# Altium PCB Membrane_Board.PcbDoc (part 3 of 5)
Units mm, origin at the board's own origin, x right, y up, seen from the top; angles counter-clockwise.
Board outline 303 x 126.06 mm, 2 copper layers (Top Layer, Bottom Layer), stack 1.499 mm thick; 248 components, 169 nets, 1258 pads, 728 vias.
Unrouted connection lines stored in the file: 317.
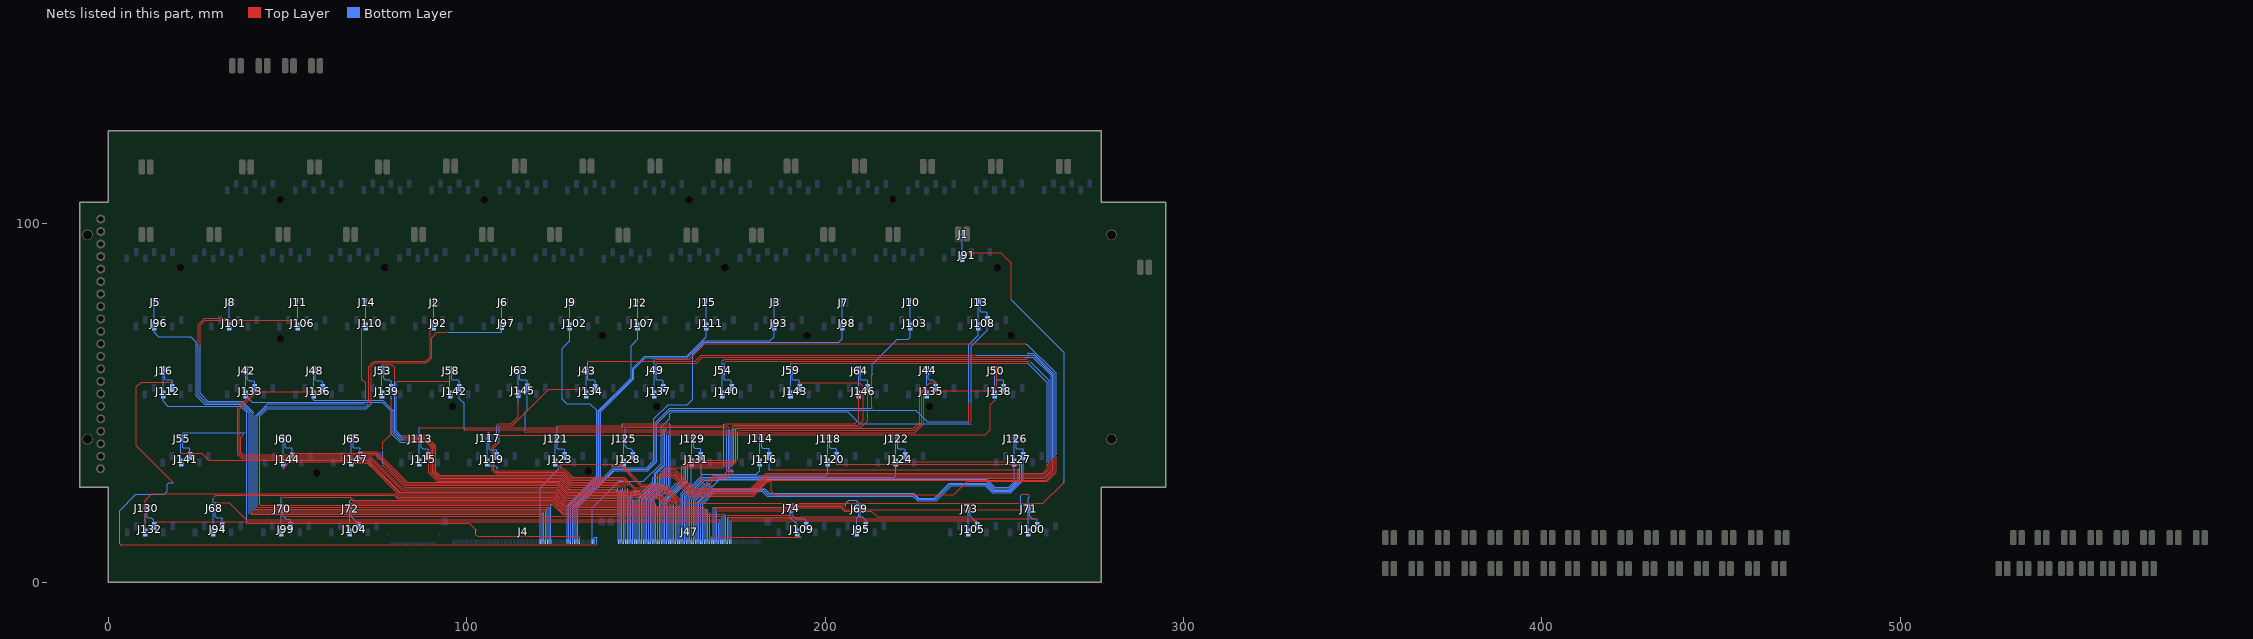
[diagram p3: the nets of this part, all layers, seen from the top]

## Via types
v1: diameter 0.4, hole 0.2, Top Layer to Bottom Layer, tented both sides, 724 vias
v2: diameter 0.4, hole 0.2, Top Layer to Bottom Layer, 3 vias
v3: diameter 0.6, hole 0.3, Top Layer to Bottom Layer, 1 vias

## Nets (pads, with @x,y where several pads share a name; then routed paths per layer and width w, separated by ;. In a path a pad name is that pad's centre, name@x,y a point inside that pad or via, vN(x,y) a via of type N, cw(c..) or ccw(c..) an arc to the next point about the centre after c; other vN are vias at no path point) (continued)
I2C5.SCL_39: J4.79 J13.4 J108.4 | length 171.7
  Top Layer w0.203: v1(240.761,49.821) 240.761,44.309 v1@240.787,44.284
  Bottom Layer w0.203: J4.79@134.981,11.374 134.981,20.749 142.362,28.129 149.27,28.129 154.249,33.108 154.249,43.344 156.591,45.686 156.591,46.965 157.238,47.611 206.293,47.611 209.621,44.284 v1(240.761,44.284)
  Bottom Layer w0.254: v1(240.761,49.821) 240.761,65.823 245.241,70.303 245.241,75.101 244.835,75.508 243.391,75.508 243.242,75.657 J13.4@243.242,78.073
I2C5.SCL_40: J4.80 J16.4 J112.4 | length 214.1
  Top Layer w0.203: v1(3.119,10.476) v1(136.291,10.476) ; v1(17.749,55.841) 9.088,55.841 7.818,54.571 7.818,38.061 v1(18.13,27.748)
  Bottom Layer w0.203: v1(3.119,10.476) 3.119,20.027 7.665,24.573 15.616,24.573 16.403,25.361 16.403,27.367 16.784,27.748 v1(18.13,27.748) ; J4.80@135.481,11.315 135.481,12.359 135.707,12.585 136.172,12.585 136.291,12.466 v1(136.291,10.476)
  Bottom Layer w0.254: J16.4@15.751,59.074 15.751,56.849 16.091,56.509 17.539,56.509 17.749,56.298 J112.4@17.749,54.251
I2C5.SDA_26: J1.3 J4.50 J91.3 | length 260.1
  Top Layer w0.203: v1(125.699,31.66) 125.699,32.27 126.385,32.955 143.098,32.955 148.813,27.24 155.265,27.24 160.497,22.008 260.751,22.008 v1(266.72,27.977) ; v1(238.272,91.96) 248.94,91.96 251.861,89.039 v1(251.861,78.904)
  Bottom Layer w0.203: J4.50@120.481,11.285 J4.50@120.481,11.315 120.481,26.442 v1(125.699,31.66) ; v1(251.861,78.904) 266.72,64.045 v1(266.72,27.977)
  Bottom Layer w0.254: J91.3@238.28,90.408 J1.3@238.28,97.072
I2C5.SDA_27: J4.51 J5.3 J96.3 | length 170.7
  Top Layer w0.203: v1(39.288,18.96) v1(120.975,18.96)
  Bottom Layer w0.203: J96.3@12.744,71.409 12.744,69.711 13.888,68.566 22.931,68.566 24.48,67.017 24.48,52.005 26.817,49.669 36.926,49.669 39.288,47.306 v1(39.288,18.96) ; J4.51@120.986,11.26 v1@120.986,18.96
  Bottom Layer w0.254: J96.3@12.744,71.409 J5.3@12.744,78.073
I2C5.SDA_28: J4.52 J8.3 J101.3 | length 170.2
  Top Layer w0.203: v1(39.822,19.443) v1(121.481,19.443)
  Top Layer w0.254: v1(25.064,66.356) 25.064,71.868 26.842,73.646 v1(33.726,73.646)
  Bottom Layer w0.203: v1(25.064,66.356) 25.064,52.31 27.274,50.1 37.129,50.1 39.822,47.408 v1(39.822,19.443) ; J4.52@121.481,11.315 v1(121.481,19.443)
  Bottom Layer w0.254: J101.3@33.726,71.409 v1(33.726,73.646) J8.3@33.726,78.073
I2C5.SDA_29: J4.53 J11.3 J106.3 | length 188.2
  Top Layer w0.203: v1(40.404,19.927) v1(121.981,19.927)
  Top Layer w0.254: v1(25.572,65.95) 25.572,71.69 27.02,73.138 v1(52.725,73.138)
  Bottom Layer w0.203: v1(25.572,65.95) 25.572,52.691 27.757,50.507 37.358,50.507 40.406,47.459 40.406,19.928 v1(40.404,19.927) ; J4.53@121.981,11.315 v1(121.981,19.927)
  Bottom Layer w0.254: J106.3@52.766,71.409 52.725,71.45 v1(52.725,73.138) 52.746,73.159 52.746,78.053 J11.3@52.766,78.073
I2C5.SDA_30: J4.54 J14.3 J110.3 | length 179.6
  Top Layer w0.203: v1(40.99,20.433) 122.448,20.433 v1(122.473,20.459) ; v1(71.775,49.821) 71.775,55.625 70.708,56.692 70.708,71.97 v1(71.775,73.037)
  Bottom Layer w0.203: v1(40.99,20.433) 40.99,46.367 44.445,49.821 v1(71.775,49.821) ; J4.54@122.481,11.315 v1@122.481,20.459
  Bottom Layer w0.254: J110.3@71.758,71.409 J14.3@71.758,78.073
I2C5.SDA_31: J2.3 J4.55 J92.3 | length 195
  Top Layer w0.203: v1(41.574,20.967) v1(122.981,20.967) ; v1(72.588,49.821) 72.588,60.21 74.01,61.632 88.514,61.632 89.733,62.851 89.733,72.249 v1(90.723,73.24)
  Bottom Layer w0.203: v1(41.574,20.967) 41.574,46.348 44.184,48.957 71.724,48.957 v1(72.588,49.821) ; J4.55@122.981,11.315 v1(122.981,20.967)
  Bottom Layer w0.254: J92.3@90.706,71.384 J2.3@90.706,78.048
I2C5.SDA_32: J4.56 J6.3 J97.3 | length 211.3
  Top Layer w0.203: v1(42.159,21.475) 42.171,21.462 v1@123.464,21.462 ; v1(73.299,49.821) 73.299,60.21 74.29,61.2 88.768,61.2 90.19,62.623 90.19,68.287 91.638,69.735 v1(94.559,69.735)
  Bottom Layer w0.203: v1(42.159,21.475) 42.159,46.341 44.292,48.475 71.953,48.475 v1(73.299,49.821) ; J4.56@123.481,11.315 v1@123.481,21.466
  Bottom Layer w0.254: v1(94.559,69.735) 109.548,69.735 109.756,69.942 J97.3@109.756,71.434 J6.3@109.756,78.099
  other v1: 123.489,21.466
I2C5.SDA_33: J4.65 J9.3 J102.3 | length 78.8
  Bottom Layer w0.203: J4.65@127.981,11.315 127.981,21.42 136.246,29.684 136.246,47.936 134.335,49.846 127.858,49.846 126.664,51.04 126.664,65.239 128.773,67.347 J102.3@128.773,71.409
  Bottom Layer w0.254: J102.3@128.773,71.409 J9.3@128.773,78.073
I2C5.SDA_34: J4.66 J12.3 J107.3 | length 74.6
  Bottom Layer w0.203: J4.66@128.481,11.315 128.481,21.381 136.627,29.526 136.627,47.844 145.872,57.09 145.872,66.057 146.984,67.169 147.302,67.487
  Bottom Layer w0.254: 147.302,67.487 147.619,67.804 J107.3@147.619,71.333 J12.3@147.619,77.997
I2C5.SDA_35: J4.67 J15.3 J111.3 | length 89.3
  Bottom Layer w0.203: J4.67@128.981,11.315 128.981,21.226 137.008,29.252 137.008,47.687 146.253,56.932 146.253,59.682 149.702,63.131 161.412,63.131 166.771,68.49 J111.3@166.771,70.928
  Bottom Layer w0.254: J111.3@166.779,70.928 J111.3@166.779,71.409 J15.3@166.779,78.073
I2C5.SDA_36: J3.3 J4.68 J93.3 | length 107.7
  Bottom Layer w0.203: J4.68@129.481,11.315 129.481,21.142 137.389,29.049 137.389,47.529 146.634,56.774 146.634,59.504 149.829,62.699 161.539,62.699 166.187,67.347 184.576,67.347 185.78,68.55 J93.3@185.78,71.409
  Bottom Layer w0.254: J93.3@185.78,71.409 J3.3@185.78,78.073
I2C5.SDA_37: J4.69 J7.3 J98.3 | length 128.2
  Bottom Layer w0.203: J4.69@129.981,11.315 129.981,21.083 140.896,31.998 150.192,31.998 152.217,34.022 152.217,45.588 156.196,49.567 161.539,49.567 163.063,51.091 163.063,63.684 166.345,66.966 203.728,66.966 204.779,68.017 J98.3@204.779,71.384
  Bottom Layer w0.254: J98.3@204.779,71.384 J7.3@204.779,78.048
I2C5.SDA_38: J4.70 J10.3 J103.3 | length 145.6
  Top Layer w0.203: v1(213.05,48.526) 213.05,58.051 v1(213.075,58.076)
  Bottom Layer w0.203: J4.70@130.481,11.374 130.481,21.024 141.066,31.609 150.388,31.609 152.598,33.819 152.598,44.487 156.636,48.526 v1(213.05,48.526) ; v1(213.075,58.076) 213.075,60.794 220.086,67.804 223.159,67.804 223.769,68.414 J103.3@223.769,71.409
  Bottom Layer w0.254: J103.3@223.761,71.409 J10.3@223.761,78.073
I2C5.SDA_39: J4.71 J13.3 J108.3 | length 171.8
  Top Layer w0.203: v1(240.101,44.843) v1(240.101,49.821)
  Bottom Layer w0.203: J4.71@130.981,11.374 130.981,20.965 141.193,31.177 150.515,31.177 152.979,33.641 152.979,44.258 156.713,47.992 225.318,47.992 228.468,44.843 v1(240.101,44.843) ; v1(240.101,49.821) 240.101,66.229 242.742,68.871 J108.3@242.742,71.409
  Bottom Layer w0.254: J108.3@242.742,71.409 J13.3@242.742,78.073
I2C5.SDA_40: J4.72 J16.3 J112.3 | length 160.8
  Top Layer w0.203: v1(38.623,16.398) 38.677,16.398 38.775,16.496 100.629,16.496 v1(102.534,14.591) ; v1@102.547,13.283 103.042,12.788 v1(131.481,12.788)
  Bottom Layer w0.203: J112.3@15.251,52.41 15.251,50.516 16.581,49.186 36.825,49.186 38.623,47.387 v1(38.623,16.398) ; v1(102.534,13.27) v1(102.534,14.591) ; J4.72@131.481,11.374 v1(131.481,12.788)
  Bottom Layer w0.254: J112.3@15.251,52.41 J16.3@15.251,59.074
I2C_2.SCL_66: J47.58 J68.4 J94.4 | length 157.3
  Top Layer w0.203: v1(29.746,22.138) 31.685,22.138 31.761,22.214 33.646,22.214 38.476,17.385 v1(170.759,17.385)
  Bottom Layer w0.203: J68.4@29.729,20.593 29.737,20.602 29.737,22.13 v1(29.746,22.138) ; J47.58@170.759,11.316 v1@170.759,17.461
  Bottom Layer w0.254: J68.4@29.729,20.593 29.729,18.385 30.112,18.002 31.62,18.002 31.769,17.853 J94.4@31.769,15.729
I2C_2.SCL_67: J47.59 J70.4 J99.4 | length 135.8
  Top Layer w0.203: v1(48.763,18.477) v1(171.267,18.477)
  Bottom Layer w0.203: J47.59@171.267,11.321 v1@171.267,18.325
  Bottom Layer w0.254: J70.4@48.755,20.568 48.759,20.564 v1@48.759,18.456 ; v1@48.763,18.452 49.601,17.614 50.646,17.614 50.795,17.465 J99.4@50.795,15.703
I2C_2.SCL_68: J47.60 J72.4 J104.4 | length 120.4
  Top Layer w0.203: v1(67.762,22.237) 68.041,21.957 123.743,21.957 126.715,18.985 v1(171.749,18.985)
  Bottom Layer w0.203: J72.4@67.77,20.568 v1@67.77,22.229 ; J47.60@171.76,11.315 v1@171.76,18.985
  Bottom Layer w0.254: J72.4@67.787,20.568 67.787,18.35 69.302,16.836 69.302,16.211 J104.4@69.81,15.703
I2C_2.SCL_69: J47.61 J74.4 J109.4 | length 33.9
  Top Layer w0.203: v1(172.257,18.681) 172.263,18.687 v1@190.817,18.687
  Bottom Layer w0.203: v1(172.257,18.681) 172.26,18.678 J47.61@172.26,11.315
  Bottom Layer w0.254: J74.4@190.758,20.593 v1(190.758,18.693) 191.786,17.665 194.305,17.665 194.678,17.292 J109.4@194.678,15.729
I2C_2.SCL_70: J47.62 J69.4 J95.4 | length 49.7
  Top Layer w0.203: v1(172.765,18.198) 193.268,18.198 193.294,18.223 v1(209.799,18.223)
  Bottom Layer w0.203: J47.62@172.76,11.315 172.76,18.193 v1(172.765,18.198)
  Bottom Layer w0.254: J69.4@209.807,20.568 209.803,20.564 209.803,18.227 v1(209.799,18.223) 210.332,18.223 211.313,17.242 J95.4@211.313,15.729
I2C_2.SCL_71: J47.63 J71.4 J100.4 | length 98.8
  Top Layer w0.203: v1@173.248,17.725 v1(259.135,17.725)
  Bottom Layer w0.203: v1(173.248,17.715) 173.26,17.703 J47.63@173.26,11.315
  Bottom Layer w0.254: J71.4@257.085,20.577 257.085,18.384 257.744,17.725 v1(259.135,17.725) 259.135,16.764 259.106,16.764 J100.4@259.125,15.791
I2C_2.SCL_72: J47.64 J73.4 J105.4 | length 80.9
  Top Layer w0.203: v1(173.756,17.207) v1(242.565,17.207)
  Bottom Layer w0.203: v1(173.756,17.207) 173.76,17.203 J47.64@173.76,11.315
  Bottom Layer w0.254: J73.4@240.423,20.568 240.423,18.485 241.701,17.207 v1(242.565,17.207) 242.565,15.883 J105.4@242.463,15.782
I2C_2.SDA_66: J47.50 J68.3 J94.3 | length 158.1
  Top Layer w0.203: v1(29.255,23.507) 29.991,24.242 79.701,24.242 80.665,23.278 124.246,23.278 127.1,20.424 v1(166.746,20.424)
  Bottom Layer w0.203: J68.3@29.255,20.62 v1(29.255,23.507) ; v1(166.746,20.424) 166.753,20.416 166.753,11.322 J47.50@166.76,11.315
  Bottom Layer w0.254: J94.3@29.229,13.929 J68.3@29.229,20.593 J68.3@29.255,20.62
I2C_2.SDA_67: J47.51 J70.3 J99.3 | length 139
  Top Layer w0.203: v1(48.255,23.71) 67.559,23.71 68.422,22.846 123.997,22.846 126.899,19.944 v1(167.254,19.944)
  Bottom Layer w0.203: v1(167.254,19.944) 167.26,19.938 J47.51@167.26,11.315
  Bottom Layer w0.254: J99.3@48.255,13.903 J70.3@48.255,20.568 v1(48.255,23.71)
I2C_2.SDA_68: J47.52 J72.3 J104.3 | length 119
  Top Layer w0.203: v1(67.279,23.024) 67.686,23.024 68.295,22.414 123.87,22.414 126.82,19.465 v1(167.762,19.465)
  Bottom Layer w0.203: J72.3@67.266,20.723 v1@67.266,23.011 ; J47.52@167.761,11.315 v1(167.762,19.465)
  Bottom Layer w0.254: J104.3@67.27,13.982 J72.3@67.27,20.568 J72.3@67.287,20.585
I2C_2.SDA_69: J47.53 J74.3 J109.3 | length 35.4
  Top Layer w0.203: v1(168.27,12.585) v1(193.111,12.585)
  Bottom Layer w0.203: J47.53@168.26,11.315 v1@168.26,12.585 ; J74.3@190.258,20.593 190.258,18.028 192.138,16.149 192.138,13.464 192.671,12.93 192.765,12.93 v1(193.111,12.585)
I2C_2.SDA_70: J47.54 J69.3 J95.3 | length 60.6
  Top Layer w0.203: v1(168.76,20.957) 190.764,20.957 191.409,21.602 205.303,21.602 v2(205.785,21.119)
  Bottom Layer w0.203: J47.54@168.76,11.315 v1(168.76,20.957) ; v2(205.785,21.119) 205.785,22.008 206.63,22.853 208.573,22.853 209.307,22.119 J69.3@209.307,20.568 209.307,18.519 208.773,17.985 J95.3@208.773,13.929
I2C_2.SDA_71: J47.55 J71.3 J100.3 | length 112.3
  Top Layer w0.203: v1(169.26,20.459) 190.977,20.459 191.739,21.221 204.515,21.221 205.481,20.255 v1(254.503,20.255) ; v1(254.503,24.573) v1(256.992,24.573)
  Bottom Layer w0.203: J47.55@169.26,11.315 v1(169.26,20.459) ; v1(254.503,20.255) v1(254.503,24.573) ; J71.3@256.595,20.568 256.595,23.516 256.992,23.913 v1(256.992,24.573)
  Bottom Layer w0.254: J100.3@256.595,14 J71.3@256.595,20.255
I2C_2.SDA_72: J47.56 J73.3 J105.3 | length 86.9
  Top Layer w0.203: v1(169.76,19.951) 189.047,19.951 191.18,19.951 192.069,20.84 204.338,20.84 205.303,19.874 212.847,19.874 214.472,18.249 v1(239.923,18.249)
  Bottom Layer w0.203: J47.56@169.76,11.315 v1@169.76,19.96
  Bottom Layer w0.254: J105.3@239.923,13.982 v1(239.923,18.249) J73.3@239.923,20.568 J73.3@239.936,20.58
I2C_3.SCL_56: J47.32 J113.4 J115.4 | length 95.5
  Top Layer w0.203: v1(89.301,36.635) 89.301,30.619 91.689,28.231 125.826,28.231 128.569,25.488 147.619,25.488 148.432,24.675 154.046,24.675 155.849,22.872 157.17,22.872 157.729,22.313 v1(157.729,21.906)
  Bottom Layer w0.203: v1@157.732,21.906 157.732,11.343 J47.32@157.76,11.315
  Bottom Layer w0.254: J113.4@87.244,40.1 87.244,37.741 87.66,37.324 89.123,37.324 89.301,37.146 v1(89.301,36.635) ; J115.4@89.284,35.236 v1@89.284,36.635
I2C_3.SCL_57: J47.41 J117.4 J119.4 | length 114.3
  Top Layer w0.203: v1(105.913,41.922) 106.751,41.083 154.452,41.083 155.62,42.252 v1(173.553,42.252) ; v1@166.619,27.799 168.741,29.921 171.509,29.921 v1(173.527,31.939)
  Bottom Layer w0.203: v1(105.913,41.922) 106.224,41.61 106.224,40.144 J117.4@106.243,40.126 106.243,37.324 ; J119.4@108.241,35.303 J119.4@108.283,35.261 ; J47.41@162.26,11.315 162.26,23.441 v1@166.619,27.799 ; v1(173.527,31.939) 173.527,42.226 v1(173.553,42.252)
  Bottom Layer w0.254: 106.243,37.324 106.573,36.994 108.151,36.994 108.3,36.845 108.3,36.234 J119.4@108.241,35.303
  other v1: 166.619,27.774
I2C_3.SCL_58: J47.42 J121.4 J123.4 | length 97.3
  Top Layer w0.203: v1(125.242,43.7) 172.486,43.7 173.045,43.141 v1(173.045,42.734) ; v1(167.355,27.774) 169.096,29.515 172.066,29.515 v1(173.99,31.439)
  Bottom Layer w0.203: J47.42@162.76,11.315 162.76,23.153 v1@167.381,27.774 ; v1(173.045,42.734) 173.045,31.66 173.266,31.439 v1(173.99,31.439)
  Bottom Layer w0.254: J121.4@125.225,40.1 125.225,37.346 125.373,37.197 127.097,37.197 127.265,37.029 J123.4@127.265,35.236 ; J121.4@125.242,40.118 v1@125.242,43.649
I2C_3.SCL_59: J47.43 J125.4 J128.4 | length 77.5
  Top Layer w0.203: v1(144.241,43.09) 145.054,43.09 145.232,43.268 171.953,43.268 v1(172.461,42.76) ; v1(168.046,27.774) 169.279,29.007 172.571,29.007 v1(174.523,30.959)
  Bottom Layer w0.203: J47.43@163.26,11.315 163.26,22.988 v1(168.046,27.774) ; v1(172.461,42.76) 172.461,31.451 172.952,30.959 v1(174.523,30.959)
  Bottom Layer w0.254: v1@144.229,43.09 144.229,40.113 J125.4@144.216,40.1 144.216,37.959 144.775,37.4 145.537,37.4 146.256,36.681 J128.4@146.256,35.236
I2C_3.SCL_60: J47.44 J129.4 J131.4 | length 34.7
  Top Layer w0.203: v1(165.349,30.263) 165.349,28.155 166.288,27.215 v1(168.27,27.215)
  Bottom Layer w0.203: J47.44@163.76,11.315 163.76,22.705 v1(168.27,27.215) ; J131.4@165.288,35.236 165.349,35.176 v1(165.349,30.263)
  Bottom Layer w0.254: J129.4@163.248,40.1 163.248,37.723 163.621,37.35 165.018,37.35 165.286,37.082 165.286,35.238 J131.4@165.288,35.236
I2C_3.SCL_61: J47.45 J114.4 J116.4 | length 188.1
  Top Layer w0.203: v1(184.322,31.381) v1(253.817,31.381) v1@253.764,31.381
  Bottom Layer w0.203: J47.45@164.26,11.315 164.26,22.393 170.442,28.575 244.684,28.575 247.137,26.123 251.322,26.123 253.817,28.617 v1(253.817,31.381) ; v1(184.322,31.381) J116.4@184.322,35.253
  Bottom Layer w0.254: J114.4@182.29,40.126 182.29,37.68 182.519,37.451 184.182,37.451 184.33,37.302 J116.4@184.33,35.261
I2C_3.SCL_62: J47.46 J118.4 J120.4 | length 171.1
  Top Layer w0.203: v1(203.245,32.955) v1(254.325,32.955)
  Bottom Layer w0.203: J47.46@164.76,11.315 164.76,22.181 168.727,26.148 183.078,26.148 184.399,24.827 224.765,24.827 226.111,23.481 230.373,23.481 234.564,27.672 245.048,27.672 246.979,25.742 251.48,25.742 254.35,28.612 v1@254.35,32.981
  Bottom Layer w0.254: J118.4@201.193,40.105 J118.4@201.197,40.1 201.197,37.741 201.589,37.35 202.759,37.35 203.237,36.871 J120.4@203.237,35.236 v1@203.237,32.955
I2C_3.SCL_63: J47.47 J122.4 J124.4 | length 152.6
  Top Layer w0.203: v1(222.295,33.565) v1(254.833,33.565)
  Bottom Layer w0.203: J47.47@165.26,11.315 165.26,21.945 169.082,25.767 182.748,25.767 184.119,24.396 224.658,24.396 225.953,23.1 230.703,23.1 234.894,27.291 244.856,27.291 246.796,25.351 251.642,25.351 254.833,28.541 v1@254.833,33.463 ; J124.4@222.27,35.211 222.295,35.185 v1(222.295,33.565)
  Bottom Layer w0.254: J122.4@220.213,40.067 220.213,37.417 220.361,37.268 222.121,37.268 222.27,37.119 J124.4@222.27,35.211 ; J122.4@220.23,40.075 J122.4@220.234,40.079
I2C_3.SCL_64: J47.48 J126.4 J127.4 | length 120.1
  Bottom Layer w0.203: J47.48@165.76,11.315 165.76,21.759 169.362,25.361 182.468,25.361 183.814,24.015 224.48,24.015 225.775,22.719 230.982,22.719 235.173,26.91 244.698,26.91 246.639,24.97 251.8,24.97 255.314,28.484 J127.4@255.314,35.211
  Bottom Layer w0.254: J126.4@253.291,40.092 J126.4@253.274,40.075 253.274,37.399 253.423,37.251 255.165,37.251 255.314,37.102 J127.4@255.314,35.211
I2C_3.SCL_65: J47.57 J130.4 J132.4 | length 169.5
  Top Layer w0.203: v1(12.796,17.182) 13.101,16.877 v1(170.251,16.877)
  Bottom Layer w0.203: J47.57@170.251,11.324 v1(170.251,16.877)
  Bottom Layer w0.254: J130.4@10.756,20.593 10.756,18.176 10.905,18.028 11.951,18.028 v1(12.796,17.182) J132.4@12.796,15.729
I2C_3.SDA_56: J47.24 J113.3 J115.3 | length 115.5
  Top Layer w0.203: 87.015,43.09 v1(143.327,43.09) ; v1(143.327,44.258) 156.789,44.258 v1(156.814,44.284)
  Bottom Layer w0.203: J115.3@86.304,32.996 J115.3@86.744,33.436 ; v1(143.327,43.09) v1(143.327,44.258) ; J47.24@153.764,11.318 153.764,23.682 156.814,26.732 v1(156.814,44.284)
  Bottom Layer w0.254: J113.3@86.731,40.113 86.752,40.134 v1@86.752,43.09 ; J115.3@86.744,33.436 J113.3@86.744,40.1
  other v1: 86.761,43.09
I2C_3.SDA_57: J47.33 J117.3 J119.3 | length 76.7
  Top Layer w0.203: v1(108.478,31.177) 127.045,31.177 129.382,28.841 143.835,28.841 146.807,25.869 154.782,25.869 157.386,23.265 158.262,22.389 v1(158.262,21.398)
  Bottom Layer w0.203: J47.33@158.26,11.315 158.261,11.316 v1(158.262,21.398)
  Bottom Layer w0.254: J119.3@105.743,33.461 105.743,33.717 J119.3@106.251,34.225 ; J117.3@105.743,40.126 105.739,40.122 105.739,34.225 J119.3@106.251,34.225 ; v1@108.478,31.254 108.478,31.9 107.89,32.488 106.251,32.488 J119.3@106.251,34.225
I2C_3.SDA_58: J47.34 J121.3 J123.3 | length 54.8
  Top Layer w0.203: v1@126.334,31.635 127.198,31.635 129.585,29.247 143.967,29.247 146.888,26.326 154.935,26.326 157.576,23.684 158.745,22.516 v1(158.745,21.906)
  Bottom Layer w0.203: J123.3@124.725,33.436 J123.3@124.725,33.641 ; 126.283,32.397 126.334,32.346 v1(126.334,31.66) ; v1(158.745,21.906) 158.752,21.899 158.752,11.322 J47.34@158.76,11.315
  Bottom Layer w0.254: J123.3@124.725,33.641 J121.3@124.725,40.1
I2C_3.SDA_59: J47.35 J125.3 J128.3 | length 44.7
  Top Layer w0.203: v1(140.355,32.473) 142.895,32.473 148.559,26.809 155.04,26.809 159.253,22.596 v1(159.253,21.398)
  Bottom Layer w0.203: v1(140.355,32.473) 143.182,32.473 143.716,33.006 J128.3@143.716,33.436 ; v1@159.256,21.398 159.256,11.318 J47.35@159.26,11.315
  Bottom Layer w0.254: J128.3@143.716,33.436 J125.3@143.716,39.839
I2C_3.SDA_60: J47.36 J129.3 J131.3 | length 30
  Bottom Layer w0.203: J47.36@159.76,11.315 159.76,24.776 162.668,27.684 162.668,33.355 J131.3@162.748,33.436
  Bottom Layer w0.254: J131.3@162.748,33.436 J129.3@162.748,40.1
I2C_3.SDA_61: J47.37 J114.3 J116.3 | length 46.4
  Bottom Layer w0.203: J47.37@160.26,11.315 160.26,24.412 165.947,30.099 180.772,30.099 181.79,31.118 J116.3@181.79,33.461
  Bottom Layer w0.254: J116.3@181.79,33.461 J114.3@181.79,40.126
I2C_3.SDA_62: J47.38 J118.3 J120.3 | length 65.1
  Bottom Layer w0.203: J47.38@160.76,11.315 160.76,24.227 165.831,29.298 169.549,29.298 169.969,29.718 200.059,29.718 200.697,30.357 J120.3@200.697,33.436
  Bottom Layer w0.254: J120.3@200.697,33.436 J118.3@200.697,40.1
I2C_3.SDA_63: J47.39 J122.3 J124.3 | length 83.8
  Bottom Layer w0.203: J47.39@161.26,11.315 161.26,24.041 166.136,28.917 169.707,28.917 170.127,29.337 219.236,29.337 219.73,29.831 J124.3@219.73,33.411
  Bottom Layer w0.254: J124.3@219.73,33.411 J122.3@219.73,40.075
I2C_3.SDA_64: J47.40 J126.3 J127.3 | length 119.7
  Bottom Layer w0.203: J47.40@161.76,10.958 161.76,23.88 166.415,28.536 169.864,28.536 170.158,28.829 170.285,28.956 244.842,28.956 244.969,28.829 247.294,26.504 251.164,26.504 252.725,28.064 252.725,33.361 J127.3@252.774,33.411
  Bottom Layer w0.254: J127.3@252.774,33.411 J126.3@252.774,40.075
I2C_3.SDA_65: J47.49 J130.3 J132.3 | length 180.8
  Top Layer w0.203: v1(10.231,16.699) 10.231,22.872 12.009,24.65 79.999,24.65 80.888,23.761 124.302,23.761 127.16,20.903 v1(166.263,20.903)
  Bottom Layer w0.203: J47.49@166.263,11.318 v1(166.263,20.903)
  Bottom Layer w0.254: J132.3@10.256,13.929 10.231,13.954 v1(10.231,16.699) 10.256,16.725 J130.3@10.256,20.593
I2C_4.SCL_41: J42.4 J47.9 J133.4 | length 153.6
  Top Layer w0.203: v1(40.838,52.615) 36.45,48.227 36.45,35.946 37.426,34.971 73.24,34.971 82.087,26.123 124.937,26.123 127.634,23.427 v1(146.271,23.427)
  Bottom Layer w0.203: J47.9@146.26,11.341 146.265,11.346 146.265,23.421 v1(146.271,23.427)
  Bottom Layer w0.254: J42.4@38.78,59.074 38.78,56.715 39.29,56.205 40.423,56.205 40.82,55.807 40.82,53.902 40.838,53.885 v1(40.838,52.615)
I2C_4.SCL_42: J47.10 J48.4 J136.4 | length 174.6
  Top Layer w0.203: v1(59.837,52.64) 59.253,53.225 40.584,53.225 36.069,48.71 36.069,35.692 37.282,34.479 73.045,34.479 81.935,25.589 124.886,25.589 127.553,22.922 v1(146.756,22.922)
  Bottom Layer w0.203: J47.10@146.756,11.319 v1(146.756,22.922)
  Bottom Layer w0.254: J48.4@57.762,59.074 57.762,56.544 58.056,56.25 59.428,56.25 59.802,55.876 J136.4@59.802,54.21 59.802,54.037 59.837,54.002 v1(59.837,52.64)
I2C_4.SCL_43: J47.11 J53.4 J139.4 | length 115.6
  Top Layer w0.203: v1(76.499,32.701) 82.621,26.58 125.09,26.58 127.757,23.913 146.832,23.913 147.26,23.485 v1(147.26,23.432)
  Top Layer w0.254: v1(76.525,36.74) 76.525,39.026 78.862,41.363 v1(78.862,51.176)
  Bottom Layer w0.203: v1(76.499,32.701) 76.512,32.714 76.512,36.727 v1(76.525,36.74) ; J47.11@147.26,11.315 v1(147.26,23.432)
  Bottom Layer w0.254: J53.4@76.822,59.049 76.822,56.865 77.203,56.483 78.414,56.483 78.862,56.035 J139.4@78.862,54.184 v1(78.862,51.176)
I2C_4.SCL_44: J47.12 J58.4 J142.4 | length 108.8
  Top Layer w0.203: v1(99.215,42.531) 154.528,42.531 v1(154.757,42.76)
  Bottom Layer w0.203: J142.4@97.861,54.21 97.912,54.159 97.912,51.193 99.215,49.889 v1(99.215,42.531) ; J47.12@147.76,11.315 147.766,11.321 147.766,23.374 152.369,27.977 152.369,30.441 154.757,32.828 v1(154.757,42.76)
  Bottom Layer w0.254: J58.4@95.821,59.074 95.821,56.657 95.97,56.509 97.413,56.509 97.861,56.061 J142.4@97.861,54.21
I2C_4.SCL_45: J47.13 J63.4 J145.4 | length 92.9
  Top Layer w0.203: v1(116.327,42.049) 154.808,42.049 155.524,42.765 v1(155.524,42.774)
  Bottom Layer w0.203: J47.13@148.26,11.315 148.266,11.321 148.266,23.264 152.75,27.748 152.75,30.187 155.189,32.625 155.189,42.438 v1(155.524,42.774)
  Bottom Layer w0.254: J63.4@114.803,59.099 114.803,56.683 114.951,56.534 116.395,56.534 116.835,56.094 J145.4@116.835,54.364 116.835,47.916 116.327,47.408 v1(116.327,42.049)
I2C_4.SCL_46: J43.4 J47.14 J134.4 | length 303.9
  Top Layer w0.203: v1@133.793,61.683 v1(133.776,61.683) 163.774,61.683 165.45,63.359 v1(241.828,63.359) ; v1(153.293,29.857) 157.703,29.857 162.731,24.829 179.619,24.829 183.785,28.994 261.413,28.994 263.493,31.075 263.493,34.453 v1(263.494,34.454)
  Bottom Layer w0.203: J47.14@148.76,11.315 148.766,11.321 148.766,23.205 153.293,27.732 v1@153.293,29.78 ; v1(241.828,63.359) 258.054,63.359 263.494,57.92 v1(263.494,34.454)
  Bottom Layer w0.254: v1@133.802,61.683 133.784,61.665 J43.4@133.784,59.074 133.784,56.657 133.933,56.509 135.377,56.509 135.824,56.061 J134.4@135.824,54.21
I2C_4.SCL_47: J47.15 J49.4 J137.4 | length 282.7
  Top Layer w0.203: v1(152.801,61.124) 164.104,61.124 165.755,62.775 v1(255.274,62.775) ; v1(153.792,30.339) 157.805,30.339 162.833,25.311 179.549,25.311 183.714,29.477 261.21,29.477 263.012,31.279 v1(263.012,33.997)
  Bottom Layer w0.203: J47.15@149.26,11.315 149.26,23.115 153.792,27.647 v1@153.792,30.263 ; v1(152.801,61.124) 152.81,61.115 152.81,59.108 J49.4@152.818,59.099 ; v1(255.274,62.775) 257.957,62.775 263.012,57.72 v1(263.012,33.997)
  Bottom Layer w0.254: J49.4@152.818,59.099 152.818,56.683 152.967,56.534 154.411,56.534 154.817,56.128 154.817,54.235 154.858,54.194 J137.4@154.833,54.168
I2C_4.SCL_48: J47.16 J54.4 J140.4 | length 260.4
  Top Layer w0.203: v1(154.291,30.822) 157.983,30.822 163.011,25.794 179.492,25.794 183.658,29.96 260.981,29.96 262.528,31.506 262.528,33.538 v1(262.529,33.54) ; v1(171.818,61.175) 172.3,61.657 v1@257.068,61.657
  Bottom Layer w0.203: J47.16@149.76,11.315 149.76,23.006 154.291,27.537 v1(154.291,30.822) ; J54.4@171.816,59.099 v1@171.816,61.072 ; v1(257.068,61.632) 262.528,56.172 v1(262.529,33.54)
  Bottom Layer w0.254: J54.4@171.816,59.099 171.816,56.683 171.965,56.534 173.408,56.534 173.815,56.128 J140.4@173.815,54.277
I2C_4.SCL_49: J47.25 J59.4 J143.4 | length 119.7
  Top Layer w0.203: 160.167,32.447 v1(174.035,32.447) ; v1(174.035,42.76) 174.035,43.446 174.416,43.827 209.189,43.827 210.586,45.224 210.586,54.52 209.489,55.618 v1(192.814,55.618)
  Bottom Layer w0.203: J47.25@154.26,11.315 154.26,22.654 159.964,28.358 v1(159.964,32.447) ; v1(174.035,32.447) v1(174.035,42.76)
  Bottom Layer w0.254: J59.4@190.815,59.099 190.815,56.683 190.964,56.534 192.408,56.534 192.814,56.128 v1(192.814,55.618) J143.4@192.814,54.277
I2C_4.SCL_50: J47.26 J64.4 J146.4 | length 101.9
  Top Layer w0.203: v1(160.599,33.006) v1(174.543,33.006) ; v1(174.543,42.404) 174.543,43.039 174.899,43.395 210.205,43.395 211.856,45.046 v1(211.856,52.59)
  Bottom Layer w0.203: J47.26@154.76,11.315 154.76,22.494 160.599,28.333 v1(160.599,33.006) ; v1(174.543,33.006) v1(174.543,42.404)
  Bottom Layer w0.254: J64.4@209.807,59.074 209.807,56.657 209.955,56.509 211.399,56.509 211.847,56.061 J146.4@211.847,54.21 ; v1(211.856,52.59) J146.4@211.856,54.2
I2C_4.SCL_51: J44.4 J47.27 J135.4 | length 120
  Top Layer w0.203: v1(161.107,33.54) v1(175.051,33.54) ; v1@175.059,42.767 v1(175.051,42.76) 175.066,42.76 175.269,42.963 224.734,42.963 226.41,44.639 226.41,52.92 229.103,55.612 v1(230.804,55.612)
  Bottom Layer w0.203: J47.27@155.26,11.315 155.26,22.41 161.107,28.256 v1(161.107,33.54) ; v1(175.051,33.54) v1(175.051,42.76) v1@175.051,42.767
  Bottom Layer w0.254: J44.4@228.814,59.099 228.814,56.683 228.963,56.534 229.891,56.534 230.812,55.612 J135.4@230.812,54.277
I2C_4.SCL_52: J47.28 J50.4 J138.4 | length 144
  Top Layer w0.203: v1(161.64,34.048) v1(175.585,34.048) ; v1(175.585,42.404) 224.988,42.404 226.893,44.309 226.893,52.818 227.553,53.479 246.806,53.479 247.814,54.487 v1(247.814,60.692)
  Bottom Layer w0.203: J47.28@155.76,11.315 155.76,22.275 161.64,28.155 v1(161.64,34.048) ; v1(175.585,34.048) v1(175.585,42.404)
  Bottom Layer w0.254: v1(247.814,60.692) J50.4@247.814,59.074 247.814,56.657 247.963,56.509 249.407,56.509 249.813,56.102 J138.4@249.813,54.251
I2C_4.SCL_53: J47.29 J55.4 J141.4 | length 167.1
  Top Layer w0.203: v1(38.032,41.693) 36.85,40.512 36.85,36.257 37.587,35.521 74.417,35.521 82.875,27.063 125.217,27.063 127.985,24.294 147.086,24.294 147.95,23.43 153.284,23.43 155.316,21.398 v1(156.255,21.398)
  Bottom Layer w0.203: v1@156.255,21.525 156.258,21.523 156.258,11.317 J47.29@156.26,11.315
  Bottom Layer w0.254: J141.4@22.745,35.47 22.745,37.078 22.339,37.484 20.895,37.484 20.746,37.633 J55.4@20.746,40.049 20.746,41.515 20.924,41.693 v1(38.032,41.693) ; J141.4@22.786,35.185 J141.4@22.786,35.47
I2C_4.SCL_54: J47.30 J60.4 J144.4 | length 127.5
  Top Layer w0.203: v1(51.303,36.337) 51.687,35.953 74.649,35.953 83.158,27.444 125.42,27.444 128.163,24.7 147.238,24.7 148.051,23.888 153.512,23.888 155.493,21.906 v1(156.763,21.906)
  Bottom Layer w0.203: J47.30@156.76,11.315 156.762,11.316 156.762,21.905 v1(156.763,21.906)
  Bottom Layer w0.254: J60.4@49.288,40.049 49.288,37.633 49.437,37.484 50.965,37.484 51.303,37.146 v1(51.303,36.337)
I2C_4.SCL_55: J47.31 J65.4 J147.4 | length 110.6
  Top Layer w0.203: v1(70.284,36.842) 70.691,36.435 74.849,36.435 83.434,27.85 125.572,27.85 128.315,25.107 147.391,25.107 148.204,24.294 153.766,24.294 155.57,22.491 156.992,22.491 157.246,22.237 v1(157.246,21.398)
  Bottom Layer w0.203: J47.31@157.26,11.315 157.278,11.333 v1@157.278,21.398
  Bottom Layer w0.254: J65.4@68.286,40.075 68.286,37.658 68.435,37.509 70.136,37.509 70.284,37.361 v1(70.284,36.842) J147.4@70.284,35.252
I2C_4.SDA_41: J42.3 J47.1 J133.3 | length 144.1
  Top Layer w0.203: v1(83.383,39.102) 88.603,39.102 90.063,37.643 90.063,30.556 92.007,28.612 126.08,28.612 128.719,25.973 v1(141.676,25.973)
  Bottom Layer w0.203: J133.3@38.159,52.288 38.239,52.207 38.239,51.986 38.814,51.411 39.035,51.411 40.146,50.3 73.498,50.3 73.515,50.283 76.393,50.283 78.953,47.723 78.953,41.5 81.351,39.102 v1(83.383,39.102) ; v1(141.676,25.973) 141.676,25.539 142.26,24.954 J47.1@142.26,11.315
  Bottom Layer w0.254: J133.3@38.159,52.288 J133.3@38.28,52.41 J42.3@38.28,59.074
I2C_4.SDA_42: J47.2 J48.3 J136.3 | length 126.6
  Top Layer w0.203: v1@82.125,39.712 88.569,39.712 90.469,37.811 90.469,30.724 92.175,29.018 126.233,29.018 128.79,26.461 135.435,26.461 135.473,26.499 v1(142.171,26.499)
  Bottom Layer w0.203: J136.3@57.141,52.288 57.141,50.88 57.26,50.761 76.55,50.761 79.42,47.891 79.42,41.693 81.402,39.712 v1(82.138,39.712) ; v1(142.171,26.499) 142.171,25.653 142.76,25.064 J47.2@142.76,11.315
  Bottom Layer w0.254: J136.3@57.141,52.288 J136.3@57.262,52.41 J48.3@57.262,59.074
I2C_4.SDA_43: J47.3 J53.3 J139.3 | length 119
  Top Layer w0.203: v1(76.347,60.718) 78.989,60.718 79.827,59.879 v1(79.827,56.273) ; v1(83.383,40.296) 88.559,40.296 90.876,37.979 90.876,30.893 92.344,29.425 126.41,29.425 128.807,27.028 142.396,27.028 142.92,26.504 v1(142.92,25.973)
  Bottom Layer w0.203: v1(79.827,56.273) 79.827,41.998 81.529,40.296 v1(83.383,40.296) ; v1(142.92,25.973) 142.92,25.488 143.26,25.148 J47.3@143.26,11.315
  Bottom Layer w0.254: J139.3@76.322,52.384 J53.3@76.322,59.049 76.334,59.061 76.334,60.705 v1(76.347,60.718)
I2C_4.SDA_44: J47.4 J58.3 J142.3 | length 124.7
  Top Layer w0.203: v1(80.309,55.688) 80.754,56.133 95.257,56.133 v1@95.27,56.12 ; v1(82.138,40.956) 88.437,40.956 91.257,38.137 91.257,31.05 92.501,29.806 126.614,29.806 128.925,27.494 142.895,27.494 143.503,26.886 143.503,26.505 v1(143.505,26.504)
  Bottom Layer w0.203: v1(80.309,55.688) 80.309,42.252 81.605,40.956 v1(82.138,40.956) ; v1(143.505,26.504) 143.505,25.46 143.76,25.204 J47.4@143.76,11.315
  Bottom Layer w0.254: v1(95.283,56.133) 95.283,52.448 J142.3@95.321,52.41 ; v1@95.295,56.146 95.295,59.049 J58.3@95.321,59.074
I2C_4.SDA_45: J47.5 J63.3 J145.3 | length 87.6
  Top Layer w0.203: v1(108.326,39.102) 107.081,37.858 107.081,31.314 108.157,30.238 126.802,30.238 129.088,27.952 143.327,27.952 144.241,27.037 v1(144.241,25.996) ; v1(108.326,43.877) 108.72,44.272 112.378,44.272 114.295,46.189 v1(114.295,49.923)
  Bottom Layer w0.203: v1(108.326,39.102) v1(108.326,43.877) ; v1(144.241,25.996) 144.241,11.333 J47.5@144.26,11.315
  Bottom Layer w0.254: v1(114.295,49.923) J145.3@114.295,52.564 J63.3@114.295,59.091
I2C_4.SDA_46: J43.3 J47.6 J134.3 | length 103.6
  Top Layer w0.203: v1@109.019,43.713 112.649,43.713 122.846,53.91 v1(133.294,53.91) ; v1(109.037,39.102) 107.487,37.553 107.487,31.482 108.326,30.644 126.944,30.644 129.154,28.434 143.657,28.434 144.836,27.255 v1(144.836,26.504) v1@144.836,26.334
  Bottom Layer w0.203: v1(109.037,39.102) v1(109.037,43.7) ; J134.3@133.284,51.945 133.294,51.954 J134.3@133.294,52.41 ; J47.6@144.76,11.315 144.808,11.363 144.808,11.954 144.836,11.982 v1@144.836,26.334
  Bottom Layer w0.254: J134.3@133.284,52.41 133.294,52.419 v1(133.294,53.91) 133.284,53.92 133.284,55.019 ; 133.284,55.028 J43.3@133.284,59.074
I2C_4.SDA_47: J47.7 J49.3 J137.3 | length 297.9
  Top Layer w0.203: v1(148.407,25.386) 154.401,25.386 v1(155.29,24.497) ; v1(152.32,62.216) 161.996,62.216 166.39,66.61 255.925,66.61 v1(256.154,66.61) ; v1(158.516,27.672) 162.174,24.015 179.903,24.015 184.018,28.129 184.697,28.129 184.988,27.838 184.988,25.425 186.055,24.359 235.814,24.359 239.584,28.129 261.894,28.129 264.459,30.695 v1(264.459,35.394)
  Bottom Layer w0.203: J47.7@145.26,11.315 145.26,24.043 146.603,25.386 v1(148.407,25.386) ; J49.3@152.318,59.099 v1@152.318,62.281 ; v1(155.29,24.497) 155.316,24.497 158.491,27.672 v1(158.516,27.672) ; v1@256.09,66.674 v1(256.154,66.61) 264.459,58.305 v1(264.459,35.394)
  Bottom Layer w0.254: J137.3@152.318,52.435 J49.3@152.318,59.099
I2C_4.SDA_48: J47.8 J54.3 J140.3 | length 271.6
  Top Layer w0.203: v1(151.836,29.349) 157.602,29.349 162.555,24.396 179.725,24.396 183.841,28.512 261.616,28.512 263.976,30.871 263.976,34.961 v1(263.977,34.962) ; v1(171.318,61.657) 171.876,62.216 256.027,62.216 256.585,62.775 v1(256.585,63.943)
  Bottom Layer w0.203: J47.8@145.76,11.315 145.76,23.781 146.654,24.675 148.407,24.675 151.836,28.104 v1(151.836,29.349) ; J54.3@171.317,59.1 v1(171.318,61.657) ; v1(256.585,63.943) 258.041,63.943 263.977,58.007 v1(263.977,34.962)
  Bottom Layer w0.254: J140.3@171.316,52.435 J54.3@171.316,59.099
I2C_4.SDA_49: J47.17 J59.3 J143.3 | length 240.1
  Top Layer w0.203: v1(154.782,31.482) 157.957,31.482 163.163,26.277 179.422,26.277 183.587,30.442 260.727,30.442 261.989,31.704 v1(261.989,33.133) ; v1(190.317,61.175) v1(256.56,61.175)
  Bottom Layer w0.203: J47.17@150.26,11.315 150.26,22.921 154.782,27.444 v1@154.782,31.304 ; J59.3@190.315,59.099 190.315,61.072 v1@190.317,61.073 ; v1(256.56,61.175) 261.989,55.746 v1(261.989,33.133)
  Bottom Layer w0.254: J143.3@190.315,52.435 J59.3@190.315,59.099
I2C_4.SDA_50: J47.18 J64.3 J146.3 | length 104.8
  Top Layer w0.203: v1(155.29,31.965) 155.293,31.968 v1(171.679,31.968) ; v1(171.679,44.258) 208.249,44.258 209.316,45.325 v1(209.316,54.196)
  Bottom Layer w0.203: J47.18@150.76,11.315 150.76,22.812 155.29,27.342 v1(155.29,31.965) ; v1(171.679,31.968) v1(171.679,44.258)
  Bottom Layer w0.254: J146.3@209.307,52.41 J64.3@209.307,59.074
I2C_4.SDA_51: J44.3 J47.19 J135.3 | length 120
  Top Layer w0.203: v1(155.773,41.693) 224.942,41.693 227.426,44.178 v1@227.426,52.606
  Bottom Layer w0.203: J47.19@151.264,11.318 151.264,22.731 155.773,27.24 v1@155.773,41.668
  Bottom Layer w0.254: J135.3@228.314,52.435 J44.3@228.314,59.099
  other v1: 227.452,52.615
I2C_4.SDA_52: J47.20 J50.3 J138.3 | length 139.2
  Top Layer w0.203: v1(156.281,41.21) 244.69,41.21 246.05,42.57 246.05,49.547 v1(247.314,50.812)
  Bottom Layer w0.203: J47.20@151.764,11.318 151.764,22.673 156.281,27.19 v1(156.281,41.21)
  Bottom Layer w0.254: v1(247.314,50.812) 247.317,50.815 J50.3@247.317,59.071 ; v1@247.368,50.815 v1@247.368,50.848
I2C_4.SDA_53: J47.21 J55.3 J141.3 | length 155.5
  Top Layer w0.203: v1(20.213,35.953) 25.979,35.953 27.916,34.016 72.645,34.016 81.478,25.183 124.734,25.183 127.503,22.414 v1(152.268,22.414)
  Bottom Layer w0.203: J47.21@152.26,11.315 152.264,11.318 v1@152.264,22.414
  Bottom Layer w0.254: J141.3@20.246,33.385 20.213,33.419 v1(20.213,35.953) 20.23,35.969 20.23,40.033 J55.3@20.246,40.049
I2C_4.SDA_54: J47.22 J60.3 J144.3 | length 128.6
  Top Layer w0.203: v1(48.737,31.736) 50.636,33.635 72.442,33.635 81.351,24.726 124.555,24.726 127.349,21.932 133.624,21.932 v1@152.725,21.932
  Bottom Layer w0.203: v1@152.742,21.932 152.742,11.332 J47.22@152.76,11.315
  Bottom Layer w0.254: v1(48.737,31.736) 48.737,33.344 J144.3@48.763,33.369 ; J144.3@48.788,33.385 J60.3@48.788,40.049
  other v1: 152.75,21.932
I2C_4.SDA_55: J47.23 J65.3 J147.3 | length 107.4
  Top Layer w0.203: v1(68.676,33.155) 72.312,33.155 81.275,24.192 124.48,24.192 127.274,21.398 133.624,21.398 v1(153.258,21.398)
  Bottom Layer w0.203: J47.23@153.26,11.315 153.259,11.316 v1(153.258,21.398)
  Bottom Layer w0.254: J65.3@67.786,40.075 J147.3@67.786,33.411 68.266,32.93 68.492,33.155 v1(68.676,33.155)